# Altium PCB power_model.PcbDoc (part 1 of 2)
Units mm, origin at the board's own origin, x right, y up, seen from the top; angles counter-clockwise.
Board outline 133.22 x 76.2 mm, 2 copper layers (Top Layer, Bottom Layer); 223 components, 133 nets, 558 pads, 66 vias.
Unrouted connection lines stored in the file: 2.
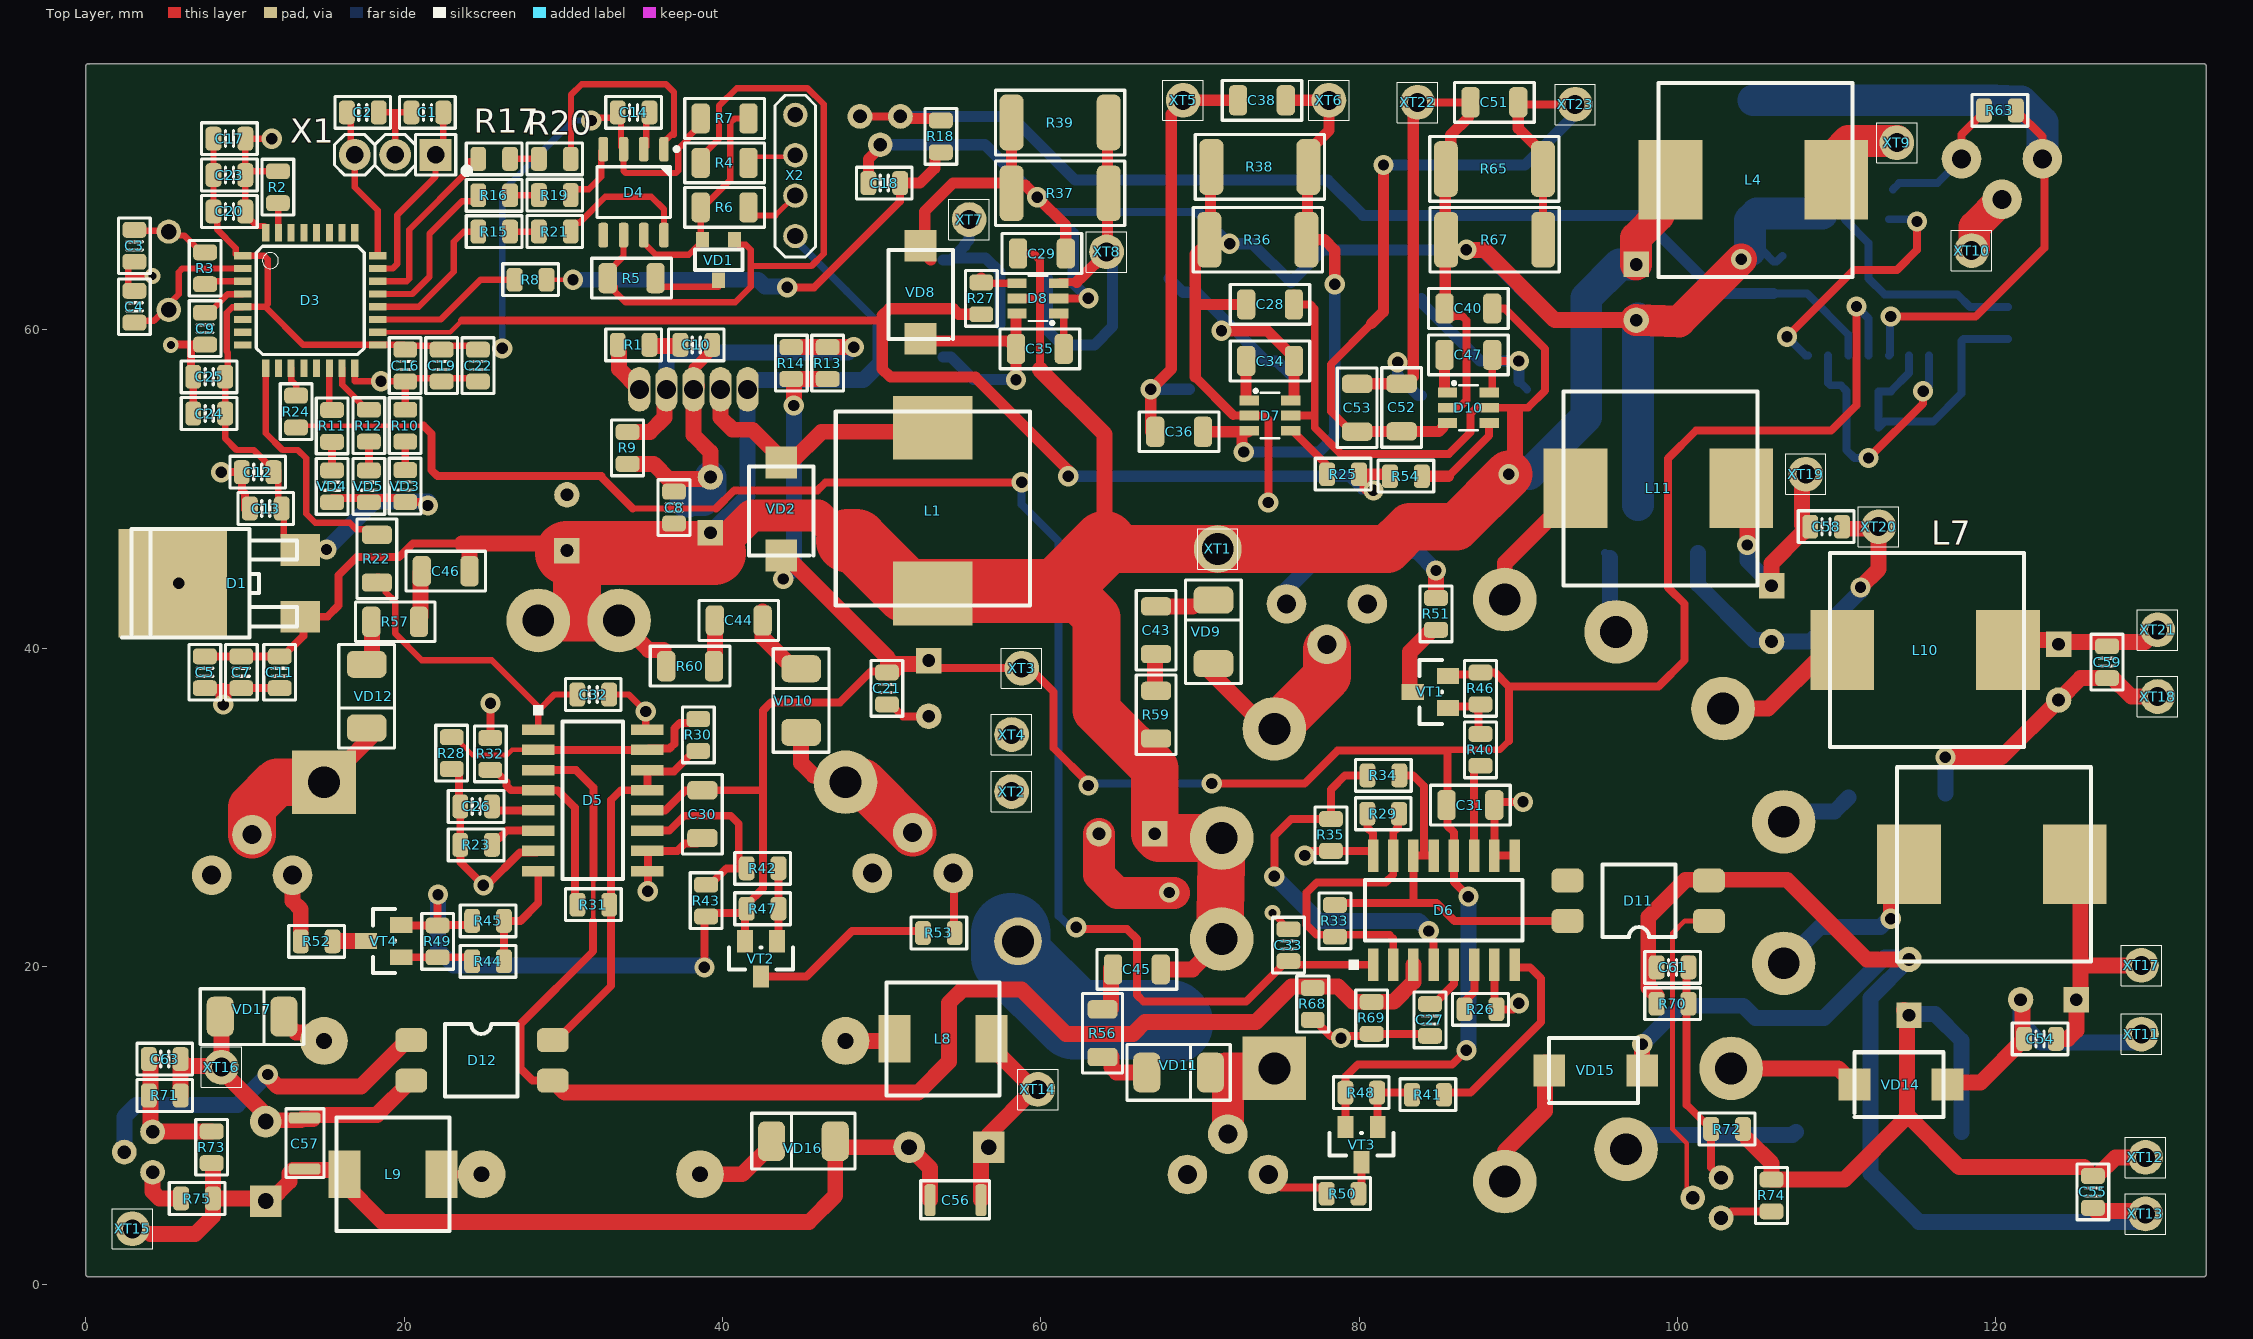
[diagram p0: Top Layer view]
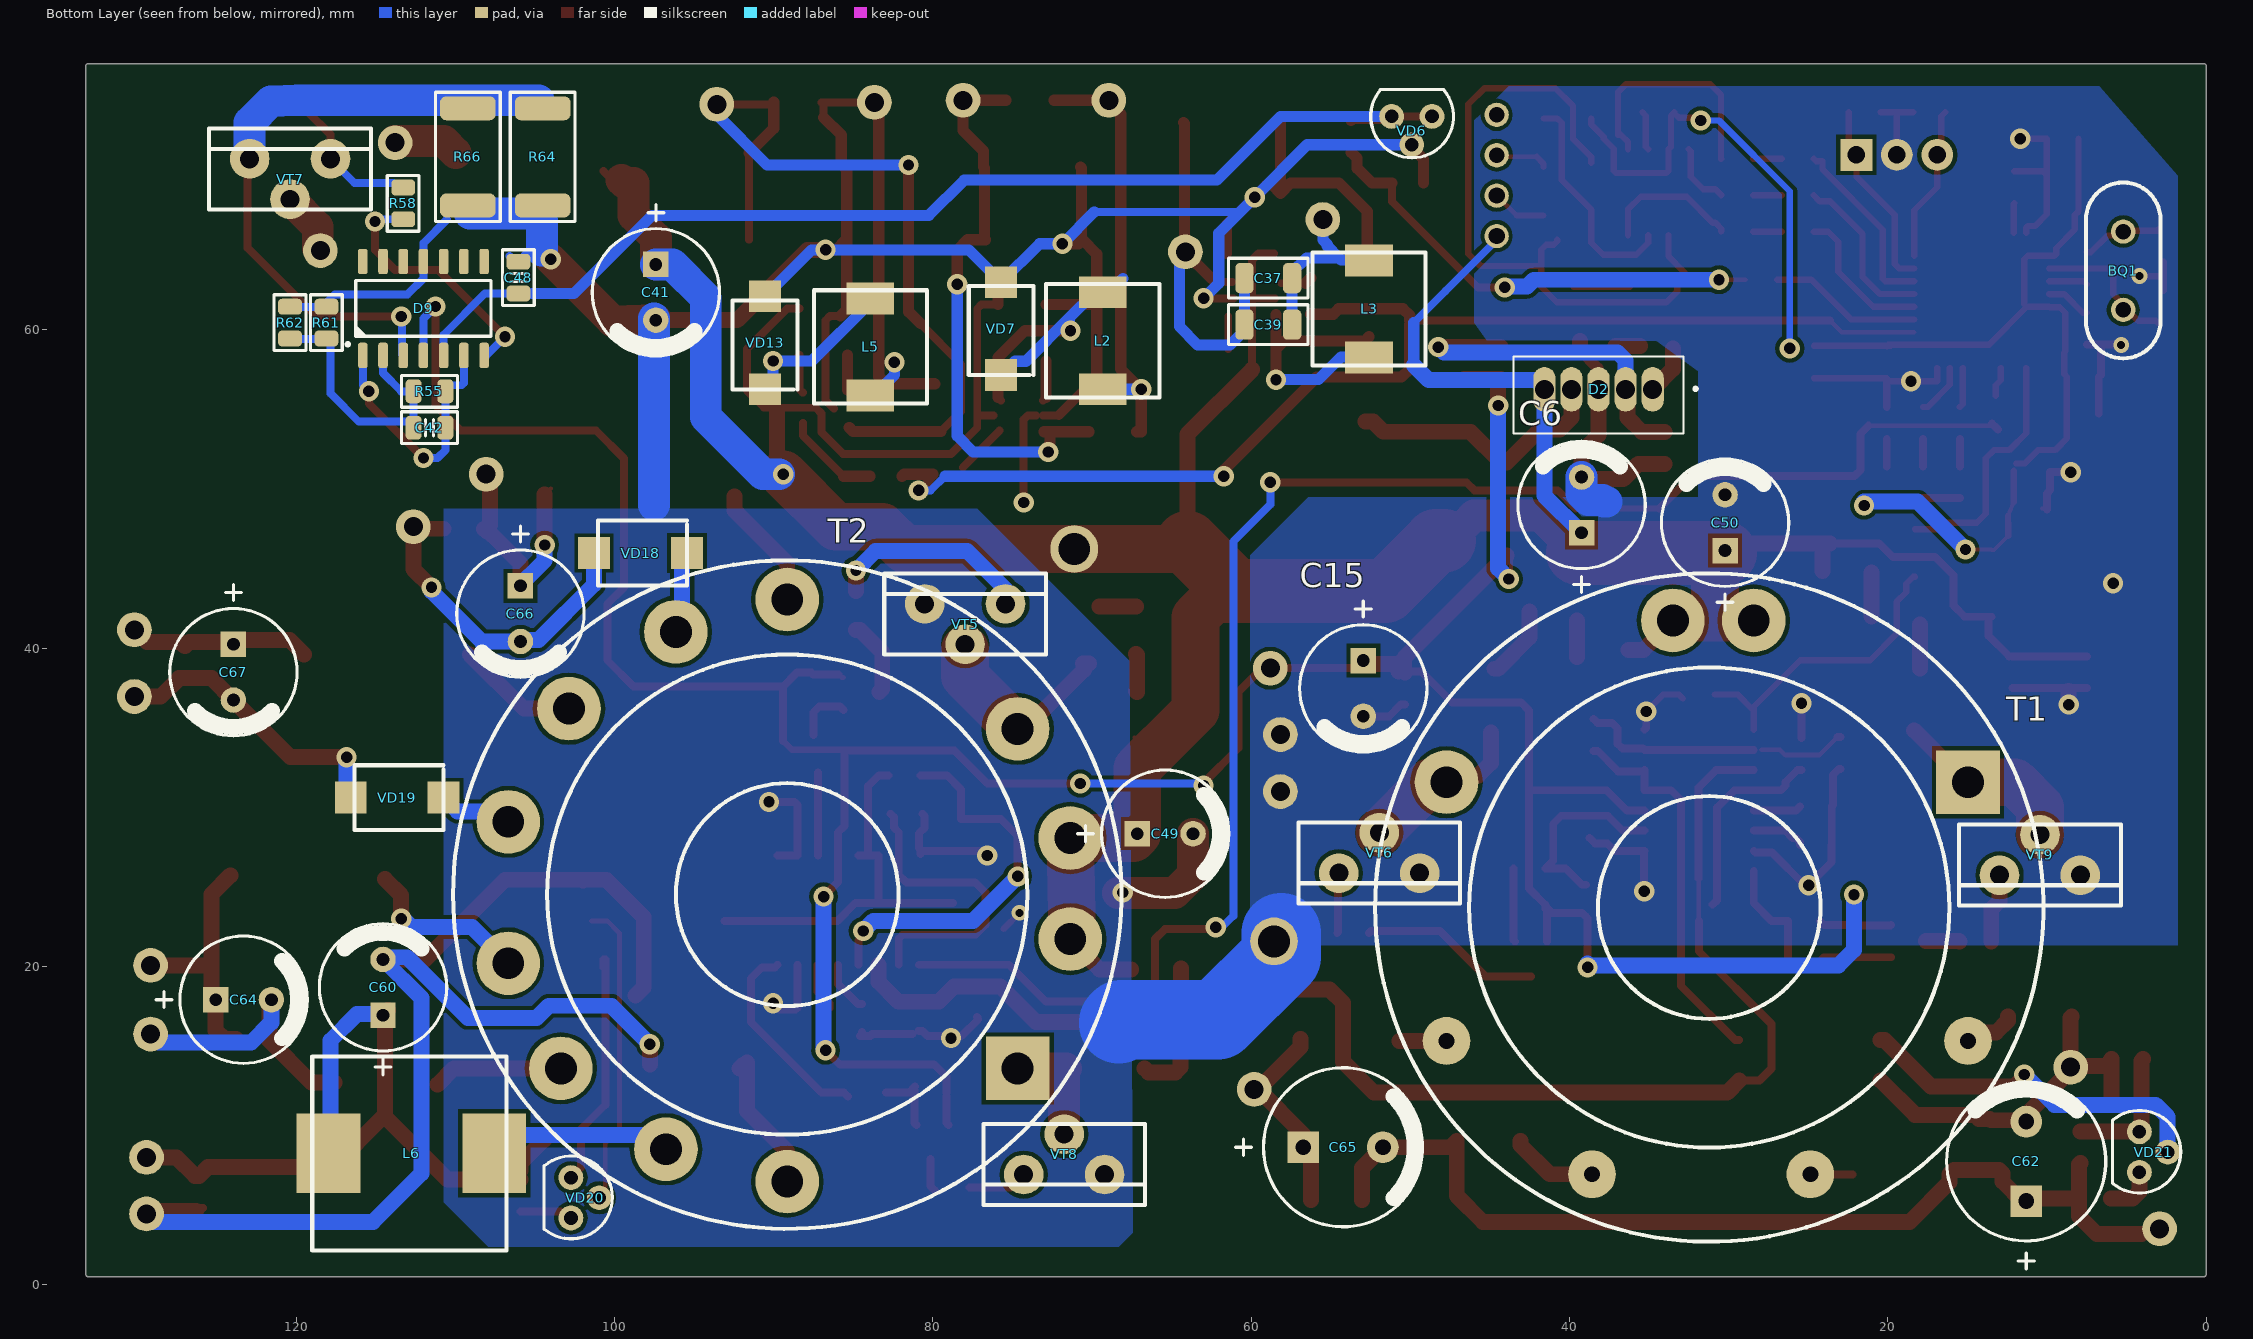
[diagram p1: Bottom Layer view, seen from below]
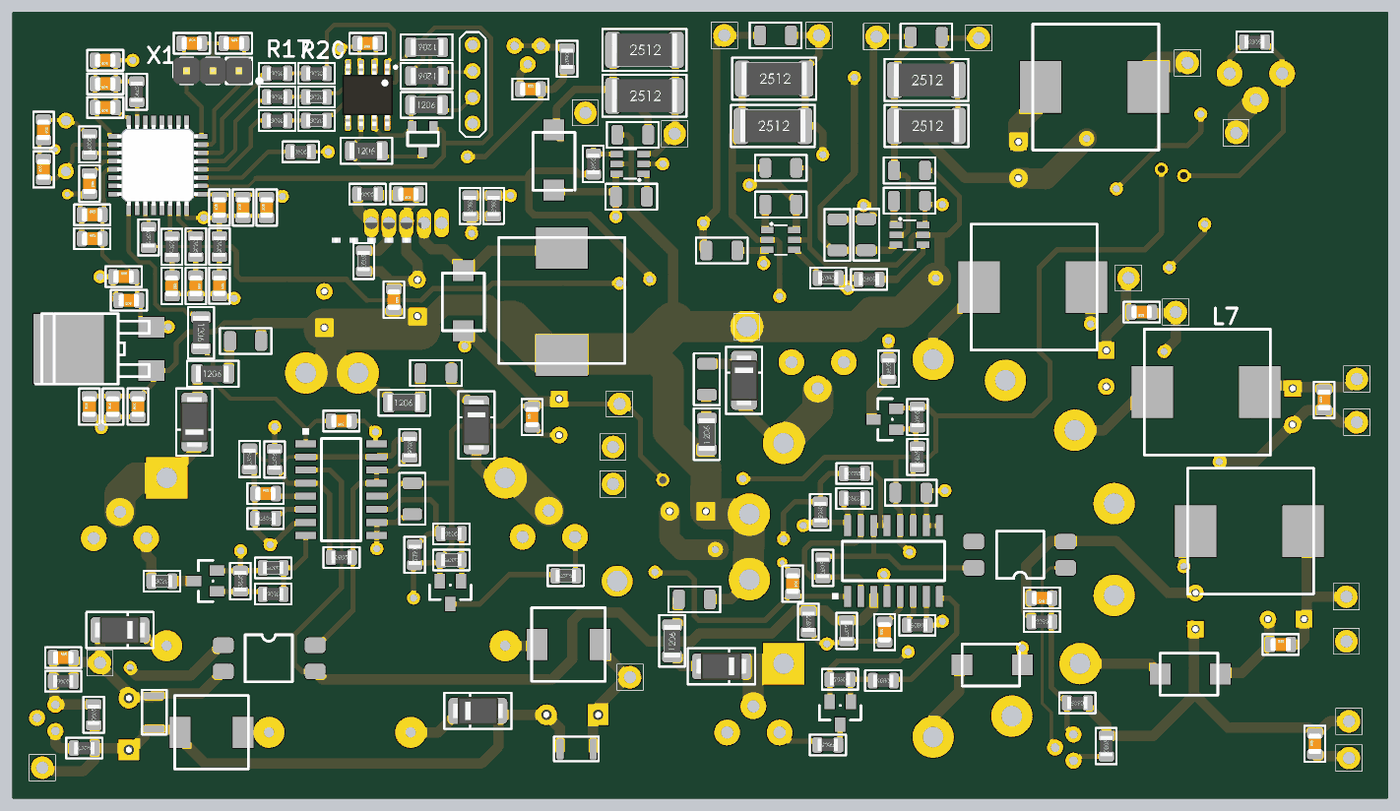
[diagram p3: 3D render of the assembled board from above, using the file's embedded part models]
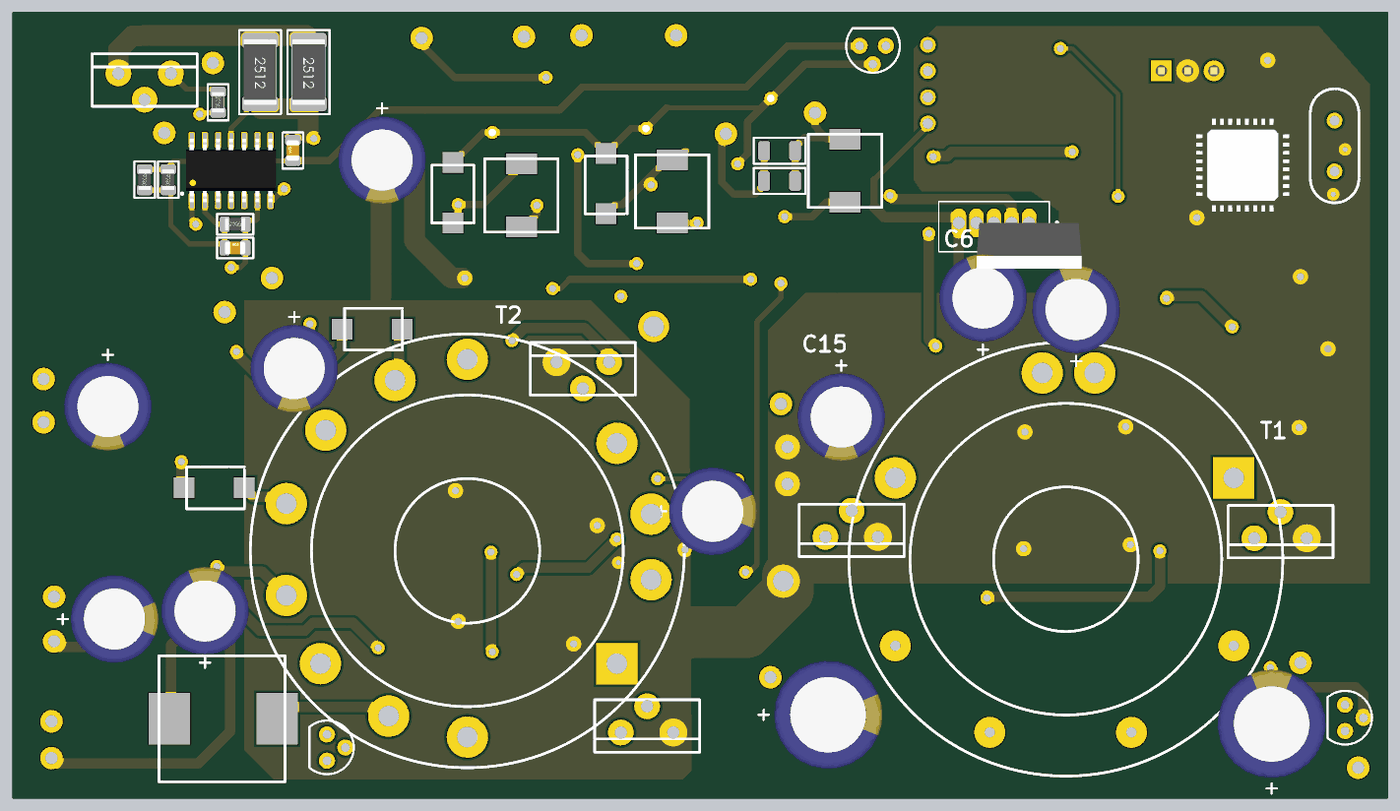
[diagram p4: 3D render of the assembled board from below, using the file's embedded part models]

## Layer stack, top to bottom
Top Solder: solder mask 0.0102, Solder Resist, Dk 3.5
Top Layer: signal copper 0.0356
Dielectric 1: dielectric 0.32, FR-4, Dk 4.8
Bottom Layer: signal copper 0.0356
Bottom Solder: solder mask 0.0102, Solder Resist, Dk 3.5

## Board outline
0.127,0.508 cw(c0.127,0.635) 0,0.635 0,76.581 cw(c0.127,76.581) 0.191,76.691 cw(c0.254,76.581) 0.254,76.708 133.096,76.708 cw(c133.096,76.581) 133.223,76.581 133.223,0.635 cw(c133.096,0.635) 133.096,0.508

## Design rules (kind name [scope] priority, off if disabled: settings)
Clearance [All] p1: gap=0.254 ignorepadtopadclearanceinfootprint=FALSE except(0: Arc-Hole Track-Hole SMDPad-Hole THPad-Hole Via-Hole Fill-Hole Poly-Hole Region-Hole Text-Hole)
PlaneClearance [All] p1: clearance=0.5
PolygonConnect [All] p1: connectstyle=Direct reliefconductorwidth=0.254 reliefentries=4 polygonreliefangle="90 Angle" airgapwidth=0.254
RoutingVias [All] p1: holewidth=0.711 width=1.27 viastyle="Through Hole" minholewidth=0.711 minwidth=1.27 maxholewidth=0.711 maxwidth=1.27
SolderMaskExpansion [All] p1: expansion=0.102
Width [All] p1: maxlimit=0.254 minlimit=0.254 preferedwidth=0.254
29 further rules are at their usual default settings.

## Classes and differential pairs
component class power_module: BQ1 C1 C2 C4 C6 C10 C11 C14 C15 C18 C19 C20 C21 C25 C27 C28 C31 C32 C33 C34 C42 C43 C44 C45 C46 C48 C51 C53 C54 C56 C58 C60 C61 C62 C63 C64 D1 D2 D3 D4 D5 D6 D7 D8 D9 D10 D11 D12 L1 L2 L3 L5 L7 L9 L11 R1 R3 R5 R6 R8 R9 R11 R14 R15 R17 R19 R21 R23 R24 R25 R26 R31 R34 R36 R39 R40 R45 R46 R48 R49 R53 R56 R58 R60 R61 R64 R66 R67 R69 R72 R74 T1 T2 VD1 VD5 VD6 VD7 VD8 VD9 VD10 VD11 VD12 VD13 VD14 VD15 VD16 VD17 VD18 VD19 VD20 VD21 VT1 VT2 VT3 VT4 VT5 VT6 VT7 VT8 VT9 X1 X2 XT1 XT2 XT3 XT4 XT5 XT6 XT7 XT8 XT9 XT10 XT11 XT12 XT13 XT14 XT15 XT16 XT17 XT18 XT19 XT21 XT22 XT23

## Components (designator, comment, footprint, x,y, rotation, side; value= is the part's Value field where it differs from the comment)
BQ1 "HC-49S" HC-49S 5.207,66.167 r270 bottom value={Value}
C1 "CC0805" CAP-0805 21.463,73.66 r0 top
C2 "CC0805" CAP-0805 17.399,73.66 r0 top value=100p
C3 "CC0805" CAP-0805 3.048,65.278 r270 top value="27 п"
C4 "CC0805" CAP-0805 3.048,61.449 r90 top value="27 п"
C5 "CAPH" CAP-0805 7.477,38.481 r90 top value="1 мк"
C6 "C-RAD-3,5X8" CAP-D8C3.5H12 39.243,48.994 r90 bottom value="1000 мкФ"
C7 "CAPH" CAP-0805 9.763,38.481 r90 top value="1 мк"
C8 "CC0805" CAP-0805 36.957,48.831 r270 top value=105
C9 "CC0805" CAP-0805 7.493,60.071 r270 top value=100н
C10 "CC0805" CAP-0805 38.354,59.055 r180 top value=330
C11 "CAPH" CAP-0805 12.176,38.481 r90 top value="1 мк"
C12 "CAPH" CAP-0805 10.795,51.054 r0 top value="1 мк"
C13 "CAPH" CAP-0805 11.303,48.768 r180 top value="1 мк"
C14 "CC0805" CAP-0805 34.417,73.66 r180 top value=GRM21BR71H104KA01
C15 "C-RAD-3,5X8" CAP-D8C3.5H12 52.959,37.465 r270 bottom value="470 мкФ"
C16 "CC0805" CAP-0805 20.066,57.756 r90 top value=100н
C17 "CC0805" CAP-0805 9.017,72.009 r180 top value=100н
C18 "CC0805" CAP-0805 50.165,69.215 r0 top value=105
C19 "CC0805" CAP-0805 22.352,57.756 r90 top value=100н
C20 "CC0805" CAP-0805 9.017,67.437 r180 top value=100н
C21 "CC0805" CAP-0805 50.332,37.465 r90 top value=105
C22 "CC0805" CAP-0805 24.638,57.756 r90 top value=4,7мк
C23 "CC0805" CAP-0805 9.017,69.723 r180 top value=4,7мк
C24 "CC0805" CAP-0805 7.747,54.737 r0 top value=10н
C25 "CC0805" CAP-0805 7.747,57.048 r0 top value="1 мк"
C26 "CC0805" CAP-0805 24.522,30.051 r0 top value=103
C27 "CC0805" CAP-0805 84.455,16.637 r90 top value=103
C28 "CC0805" CAP-1206 74.406,61.595 r180 top value=105
C29 "CC0805" CAP-1206 60.071,64.794 r0 top value=105
C30 "C-RAD-3,5X8" CAP-1206 38.735,29.567 r270 top value="1000 мкФ"
C31 "C-RAD-3,5X8" CAP-1206 86.995,30.136 r0 top value="1000 мкФ"
C32 "CC0805" CAP-0805 31.877,37.084 r180 top value=1н
C33 "CC0805" CAP-0805 75.565,21.336 r270 top value=1н
C34 "CC0805" CAP-1206 74.406,58.039 r180 top value=105
C35 "CC0805" CAP-1206 59.944,58.801 r0 top value=105
C36 "CC0805" CAP-1206 68.691,53.594 r0 top value=105
C37 "CC0805" CAP-1206 58.928,63.246 r0 bottom value=105
C38 "CC0805" CAP-1206 73.898,74.422 r0 top value=105
C39 "CC0805" CAP-1206 58.928,60.325 r0 bottom value=105
C40 "CC0805" CAP-1206 86.868,61.341 r180 top value=105
C41 "C-RAD-3,5X8" CAP-D8C3.5H12 97.409,62.357 r270 bottom value="2200 мкФ"
C42 "CC0805" CAP-0805 111.633,53.848 r180 bottom value=103
C43 "CC0805" CAP-1206 67.246,41.124 r90 top value=105
C44 "CC0805" CAP-1206 41.021,41.735 r0 top value=105
C45 "CC0805" CAP-1206 66.04,19.812 r0 top value=105
C46 "CC0805" CAP-1206 22.606,44.831 r0 top value=105
C47 "CC0805" CAP-1206 86.868,58.42 r180 top value=105
C48 "CC0805" CAP-0805 106.045,63.278 r90 bottom value=103
C49 "C-RAD-3,5X8" CAP-D8C3.5H12 65.405,28.337 r180 bottom value="1000 мкФ"
C50 "C-RAD-3,5X8" CAP-D8C3.5H12 30.226,47.879 r90 bottom value="1000 мкФ"
C51 "CC0805" CAP-1206 88.503,74.295 r0 top value=105
C52 "CC0805" CAP-1206 82.677,55.118 r270 top value=105
C53 "CC0805" CAP-1206 79.883,55.102 r270 top value=105
C54 "CC0805" CAP-0805 122.793,15.446 r0 top value=105
C55 "CC0805" CAP-0805 126.111,5.826 r90 top value=105
C56 "CC0805" CAP-1808(4_5x2_0mm) 54.621,5.286 r0 top value=105
C57 "CC0805" CAP-1808(4_5x2_0mm) 13.716,8.89 r270 top value=105
C58 "CC0805" CAP-0805 109.347,47.625 r180 top value=105
C59 "CC0805" CAP-0805 127,39.116 r90 top value=105
C60 "C-RAD-3,5X8" CAP-D8C3.5H12 114.554,18.685 r90 bottom value="1000 мкФ"
C61 "CC0805" CAP-0805 99.695,19.939 r180 top value=105
C62 "C-RAD-3,5X8" CAP-D10C5H20 11.303,7.747 r90 bottom value="1000 мкФ"
C63 "CC0805" CAP-0805 4.953,14.176 r0 top value=105
C64 "C-RAD-3,5X8" CAP-D8C3.5H12 123.317,17.907 r180 bottom value="1000 мкФ"
C65 "C-RAD-3,5X8" CAP-D10C5H20 54.229,8.636 r180 bottom value="1000 мкФ"
C66 "C-RAD-3,5X8" CAP-D8C3.5H12 105.918,42.164 r270 bottom value="1000 мкФ"
C67 "C-RAD-3,5X8" CAP-D8C3.5H12 123.952,38.485 r270 bottom value="1000 мкФ"
D1 "LM78M05" DPAK(IR) 13.371,41.969 r90 top value=LM3,3V
D2 "LM2577T-ADJ/NOPB" VREG_LM2577T-ADJ/NOPB 34.778,56.261 r0 bottom
D3 "STM32F042K6T6" QFP80P900X900X160-32N 14.097,61.849 r0 top
D4 "SN65HVD230" 8-SOIC 34.417,68.652 r270 top
D5 "TL494CD" SOIC16MY 28.424,34.877 r0 top value=TL494D
D6 "TL494CD" SOIC16MY 80.877,20.103 r90 top value=TL494D
D7 "AP3211" SOT23-6A 74.406,54.61 r270 top
D8 "AP3211" SOT23-6A 59.817,61.976 r90 top
D9 "MC34074D_VCC" 14-SOIC 112.014,61.341 r90 bottom value=LMV324
D10 "AP3211" SOT23-6A 86.868,55.102 r270 top
D11 "PC817" PC123PJ 102.032,22.86 r180 top
D12 "PC817" PC123PJ 20.396,15.367 r0 top
L1 "RLH" L_HCJRH01207 53.213,48.768 r90 top value="100 мкГн 3A"
L2 "RLH" L_HCJRH0704 69.326,59.309 r270 bottom value="HCJRH0704-470MT (47 мкГн 0,88A 7mm x 7mm)"
L3 "RLH" L_HCJRH0704 52.594,61.308 r90 bottom value="HCJRH0704-470MT (47 мкГн 0,88A 7mm x 7mm)"
L4 "RLH" L_HCJRH01207 104.902,69.419 r0 top value="HCJRH1207 - 100MT (10 мкГн 5,4A 12mm x 12mm)"
L5 "RLH" L_HCJRH0704 83.931,58.928 r270 bottom value="HCJRH0704-470MT (47 мкГн 0,88A 7mm x 7mm)"
L6 "RLH" L_HCJRH01207 112.903,8.255 r0 bottom value="HCJRH1207 - 470MT 47 мкГн 2,5A 12mm x 12mm"
L7 "RLH" L_HCJRH01207 119.888,26.416 r0 top value="HCJRH1207 - 470MT 47 мкГн 2,5A 12mm x 12mm"
L8 "RLH" L_HCJRH0704 53.848,15.446 r0 top value="HCJRH1207 - 470MT 47 мкГн 2,5A 12mm x 12mm"
L9 "RLH" L_HCJRH0704 19.304,6.937 r180 top value="HCJRH1207 - 470MT 47 мкГн 2,5A 12mm x 12mm"
L10 "RLH" L_HCJRH01207 115.697,39.878 r0 top value="HCJRH1207 - 470MT 47 мкГн 2,5A 12mm x 12mm"
L11 "RLH" L_HCJRH01207 98.933,50.038 r0 top value="HCJRH1207 - 470MT 47 мкГн 2,5A 12mm x 12mm"
R1 "RC0805" RES-0805 34.417,59.055 r0 top value="2,2 K"
R2 "Resoistor 0805" RES-0805 12.065,68.961 r90 top value=0805S8J0103T5E
R3 "Resoistor 0805" RES-0805 7.493,63.865 r90 top value=0805S8J0103T5E
R4 "Resistor 1206" RES-1206 40.132,70.485 r180 top value=1206W4J0200T5E
R5 "Resistor 1206" RES-1206 34.29,63.246 r0 top value=1206W4J0200T5E
R6 "Resistor 1206" RES-1206 40.132,67.691 r0 top value=1206W4J0200T5E
R7 "Resistor 1206" RES-1206 40.132,73.279 r180 top value=1206W4J0200T5E
R8 "RC0805" RES-0805 27.94,63.146 r0 top value=1K
R9 "RC0805" RES-0805 34.036,52.578 r90 top value="2,0 K"
R10 "Resoistor 0805" RES-0805 20.066,53.975 r270 top value=0805S8J0103T5E
R11 "Resoistor 0805" RES-0805 15.47,53.959 r270 top value=0805S8J0103T5E
R12 "Resoistor 0805" RES-0805 17.78,53.975 r270 top value=0805S8J0103T5E
R13 "RC0805" RES-0805 46.609,57.912 r270 top value="17,4 K"
R14 "RC0805" RES-0805 44.323,57.912 r270 top value="100 K"
R15 "Resoistor 0805" RES-0805 25.654,66.167 r180 top value=0805S8J0103T5E
R16 "Resoistor 0805" RES-0805 25.654,68.453 r180 top value=0805S8J0103T5E
R17 "Resoistor 0805" RES-0805 25.654,70.739 r180 top value=0805S8J0103T5E
R18 "RC0805" RES-0805 53.721,72.152 r270 top value=1K
R19 "Resoistor 0805" RES-0805 29.464,68.461 r180 top value=0805S8J0101T5E
R20 "Resoistor 0805" RES-0805 29.464,70.739 r180 top value=0805S8J0101T5E
R21 "Resoistor 0805" RES-0805 29.464,66.176 r180 top value=0805S8J0101T5E
R22 "RC0805" RES-1206 18.288,45.617 r270 top value="39 К"
R23 "RC0805" RES-0805 24.522,27.638 r0 top value="12 К"
R24 "RC0805" RES-0805 13.208,54.864 r270 top value="39 К"
R25 "RC0805" RES-0805 78.994,50.927 r180 top value=1K
R26 "RC0805" RES-0805 87.63,17.303 r180 top value="12 К"
R27 "RC0805" RES-0805 56.261,61.976 r90 top value=1K
R28 "RC0805" RES-0805 22.987,33.401 r90 top value="39 К"
R29 "RC0805" RES-0805 81.518,29.591 r0 top value="39 К"
R30 "RC0805" RES-0805 38.481,34.544 r270 top value="39 К"
R31 "RC0805" RES-0805 31.885,23.876 r0 top value="10 К"
R32 "RC0805" RES-0805 25.411,33.353 r90 top value="39 К"
R33 "RC0805" RES-0805 78.486,22.86 r90 top value="39 К"
R34 "RC0805" RES-0805 81.534,32.004 r0 top value="10 К"
R35 "RC0805" RES-0805 78.232,28.257 r270 top value="39 К"
R36 "RC0805" RES-2512 73.644,65.659 r0 top value=1K
R37 "RC0805" RES-2512 61.214,68.58 r0 top value=1K
R38 "RC0805" RES-2512 73.771,70.231 r0 top value=1K
R39 "RC0805" RES-2512 61.214,73.025 r0 top value=1K
R40 "RC0805" RES-0805 87.63,33.607 r90 top value=10K
R41 "RC0805" RES-0805 84.328,11.938 r180 top value=10K
R42 "RC0805" RES-0805 42.521,26.162 r0 top value=10K
R43 "RC0805" RES-0805 38.973,24.13 r270 top value=10K
R44 "RC0805" RES-0805 25.273,20.32 r180 top value=10K
R45 "RC0805" RES-0805 25.273,22.86 r180 top value=10K
R46 "RC0805" RES-0805 87.63,37.465 r90 top value="10 К"
R47 "RC0805" RES-0805 42.521,23.622 r180 top value="10 К"
R48 "RC0805" RES-0805 80.137,12.065 r180 top value="10 К"
R49 "RC0805" RES-0805 22.098,21.574 r90 top value="10 К"
R50 "RC0805" RES-0805 78.962,5.715 r180 top value=100
R51 "RC0805" RES-0805 84.836,42.148 r90 top value=100
R52 "RC0805" RES-0805 14.502,21.574 r180 top value=100
R53 "RC0805" RES-0805 53.594,22.098 r0 top value=100
R54 "RC0805" RES-0805 82.947,50.8 r0 top value=1K
R55 "RC0805" RES-0805 111.633,56.134 r0 bottom value=100К
R56 "RC0805" RES-1206 63.881,15.803 r90 top value="10 К"
R57 "RC0805" RES-1206 19.431,41.656 r0 top value="10 К"
R58 "RC0805" RES-0805 113.284,67.945 r90 bottom value=220
R59 "RC0805" RES-1206 67.246,35.814 r90 top value="10 К"
R60 "RC0805" RES-1206 37.966,38.862 r0 top value="10 К"
R61 "RC0805" RES-0805 118.11,60.452 r90 bottom value=3,9К
R62 "RC0805" RES-0805 120.396,60.452 r90 bottom value="39 К"
R63 "RC0805" RES-0805 120.269,73.787 r0 top value=100К
R64 "RC0805" RES-2512 104.521,70.866 r270 bottom value=0,8
R65 "RC0805" RES-2512 88.503,70.104 r0 top value=1K
R66 "RC0805" RES-2512 109.22,70.866 r270 bottom value=0,8
R67 "RC0805" RES-2512 88.519,65.659 r0 top value=1K
R68 "RC0805" RES-0805 77.089,17.637 r90 top value="1 К"
R69 "RC0805" RES-0805 80.788,16.764 r90 top value="1 К"
R70 "RC0805" RES-0805 99.695,17.653 r180 top value={Value}
R71 "RC0805" RES-0805 4.953,11.89 r0 top value={Value}
R72 "RC0805" RES-0805 103.124,9.779 r180 top value={Value}
R73 "RC0805" RES-0805 7.901,8.636 r90 top value={Value}
R74 "RC0805" RES-0805 105.918,5.604 r90 top value={Value}
R75 "RC0805" RES-0805 6.985,5.413 r0 top value={Value}
T1 "TRANS_2" TRANS_R15mm_I2_II2_B 31.218,23.701 r270 bottom locked
T2 "TRANS_2" "TRANS_R15mm_I2_II4 -" 89.154,24.511 r0 bottom locked
VD1 "Diode Surface - CDSOT23-SM712" SOT-23A 40.767,65.65 r180 top value=CDSOT23-SM712
VD2 "SS310F-HF" SS320F 43.688,48.616 r270 top
VD3 "LCW LED_ORIGINAL" CAP-0805 20.066,50.181 r270 top
VD4 "LCW LED_ORIGINAL" CAP-0805 15.47,50.165 r270 top
VD5 "LCW LED_ORIGINAL" CAP-0805 17.78,50.165 r270 top
VD6 "TL431_TO93" TO92-LM_TL431_TO93(Primary) 48.641,73.406 r0 bottom value=TL431
VD7 "SS310F-HF" SS320F 75.716,59.944 r270 bottom
VD8 "SS310F-HF" SS320F 52.451,62.23 r270 top
VD9 "1N4148WS" DIODE-SMA 70.848,41.021 r90 top
VD10 "1N4148WS" DIODE-SMA 44.943,36.703 r90 top
VD11 "1N4148WS" DIODE-SMA 68.659,13.335 r0 top
VD12 "1N4148WS" DIODE-SMA 17.642,36.98 r270 top
VD13 "SS310F-HF" SS320F 90.551,59.055 r270 bottom
VD14 "1N4148WS" SS320F 113.919,12.573 r180 top
VD15 "1N4148WS" SS320F 94.742,13.462 r180 top
VD16 "SS310F-HF    100V 3A SMD Шоткі-діод" DIODE-SMA 45.085,9.017 r180 top
VD17 "SS310F-HF    100V 3A SMD Шоткі-діод" DIODE-SMA 10.441,16.843 r0 top
VD18 "1N4148WS" SS320F 98.247,45.974 r180 bottom
VD19 "1N4148WS" SS320F 113.538,30.607 r180 bottom
VD20 "TL431_TO93" TO92-LM_TL431_TO93(Primary) 102.743,6.731 r270 bottom value=TL431
VD21 "TL431_TO93" TO92-LM_TL431_TO93(Primary) 4.191,9.604 r270 bottom value=TL431
VT1 "BC847_IPC" SOT-23_IPC 85.581,36.227 r90 top value=BC857
VT2 "BC847_IPC" SOT-23_IPC 43.434,21.574 r180 top value=BC857
VT3 "BC847_IPC" SOT-23_IPC 81.173,9.906 r180 top value=BC857
VT4 "BC847_IPC" SOT-23_IPC 19.812,20.574 r90 top value=BC857
VT5 "IRF2807_VERT" TO-220 75.438,42.775 r270 bottom value=12N10
VT6 "IRF2807_VERT" TO-220 54.494,25.86 r90 bottom value=12N10
VT7 "IRF2807_VERT" TO-220 117.856,70.739 r270 bottom value=IR530
VT8 "IRF2807_VERT" TO-220 74.295,6.921 r90 bottom value=12N10
VT9 "IRF2807_VERT" TO-220 12.981,25.733 r90 bottom value=12N10
X1 "PLS-3" CON-PLS-3 19.431,70.993 r180 top
X2 "15EDGVC-3.5-04P-14-00AH" JUMPER4 44.577,65.889 r90 top
XT1 "XT" CON1,2#1 71.12,46.228 r90 top
XT2 "XT" CON1,2#2 58.166,30.988 r180 top
XT3 "XT" CON1,2#2 58.801,38.735 r90 top
XT4 "XT" CON1,2#2 58.164,34.568 r180 top
XT5 "XT" CON1,2#2 68.945,74.422 r0 top
XT6 "XT" CON1,2#2 78.105,74.422 r0 top
XT7 "XT" CON1,2#2 55.499,66.929 r0 top
XT8 "XT" CON1,2#2 64.135,64.897 r0 top
XT9 "XT" CON1,2#2 113.792,71.755 r90 top
XT10 "XT" CON1,2#2 118.491,64.979 r90 top
XT11 "XT" CON1,2#2 129.159,15.748 r90 top
XT12 "XT" CON1,2#2 129.413,8.001 r180 top
XT13 "XT" CON1,2#2 129.413,4.445 r180 top
XT14 "XT" CON1,2#2 59.817,12.271 r90 top
XT15 "XT" CON1,2#2 2.921,3.513 r90 top
XT16 "XT" CON1,2#2 8.509,13.668 r180 top
XT17 "XT" CON1,2#2 129.159,20.066 r90 top
XT18 "XT" CON1,2#2 130.175,36.957 r90 top
XT19 "XT" CON1,2#2 108.069,50.927 r180 top
XT20 "XT" CON1,2#2 112.649,47.625 r180 top
XT21 "XT" CON1,2#2 130.175,41.148 r90 top
XT22 "XT" CON1,2#2 83.677,74.295 r270 top
XT23 "XT" CON1,2#2 93.583,74.168 r270 top

## Footprints (in the part's own frame and the unit in brackets; to place one, negate y for a bottom-side part, rotate by r counter-clockwise, add the part's x,y. Pads: shape width x height; smd on the part's side, far side on the other; paste and mask are expansions set on the pad)
8-SOIC [mm] "pitch 1.27 mm"
  rrect50% 1.55x0.6 smd paste-0.1: 1(-2.7,1.905) 2(-2.7,0.635) 3(-2.7,-0.635) 4(-2.7,-1.905) 5(2.7,-1.905) 6(2.7,-0.635) 7(2.7,0.635) 8(2.7,1.905)
  silkscreen extent -2.82,-2.3 1.61,2.83, body extent -3,-2.45 3,2.45, height 1.75
14-SOIC [mm] "pitch 1.27 mm"
  rrect50% 1.6x0.6 smd paste-0.1: 1(-2.95,3.81) 2(-2.95,2.54) 3(-2.95,1.27) 4(-2.95,0) 5(-2.95,-1.27) 6(-2.95,-2.54) 7(-2.95,-3.81) 8(2.95,-3.81) 9(2.95,-2.54) 10(2.95,-1.27) 11(2.95,0) 12(2.95,1.27) 13(2.95,2.54) 14(2.95,3.81)
  silkscreen extent -2.35,-4.25 1.75,4.85, body extent -3.07,-4.34 3.07,4.36, height 1.78
CAP-0805 [mm]
  rrect50% 1x1.5 smd: 1(-1,0) 2(1,0)
  silkscreen extent -1.75,-1 1.75,1, body extent -1,-0.62 1,0.63, height 0.78
CAP-1206 [mm]
  rrect50% 1.15x1.9 smd: 1(-1.5,0) 2(1.5,0)
  silkscreen extent -2.5,-1.25 2.5,1.25, body extent -0.2,-0.2 0.05,0, height 0.25
CAP-1808(4_5x2_0mm) [mm]
  rrect50% 0.7x2 smd: 1(-1.575,0.025) 2(1.626,0.025)
  silkscreen extent -2.16,-1.14 2.16,1.24, body extent -0.51,-0.33 -0.25,-0.13, height 0.25
CAP-D8C3.5H12 [mm]
  rect 1.6x1.6 hole 0.8: 1(-1.75,0)
  round 1.6 hole 0.8: 2(1.75,0)
  silkscreen extent -5.5,-4 4,4, body extent -4.25,-4.25 4.25,4.25, height 13
CAP-D10C5H20 [mm]
  rect 2x2 hole 1: 1(-2.5,0)
  round 2 hole 1: 2(2.5,0)
  silkscreen extent -6.75,-5 5,5, body extent -5.25,-5.25 5.25,5.25, height 22.1
CON1,2#1 [mm]
  round 3 hole 2: 1(0,0)
  silkscreen extent -1.27,-1.27 1.27,1.27
CON1,2#2 [mm]
  round 2.184 hole 1.194: 1(0,0)
  silkscreen extent -1.27,-1.27 1.27,1.27
CON-PLS-3 [mm]
  rect 2x2 hole 1.1: 1(-2.54,0)
  round 2 hole 1.1: 2(0,0) 3(2.54,0)
  silkscreen extent -4.7,-1.27 3.81,1.27, body extent -3.81,-1.27 3.81,1.27, height 8.54
DIODE-SMA [mm]
  rrect50% 1.7x2.5 smd: 1(-2,0) 2(2,0)
  round 0.5 on Mech4: ""(2,0.9)
  silkscreen extent -3.25,-1.75 3.25,1.75, body extent -2.5,-1.35 2.5,1.35, height 2.28
DPAK(IR) [mm]
  rect 2x2.5 smd: 1(0,-0.1) 3(4.2,-0.1)
  rect 6.8x6.8 smd: 2(2.1,7.91)
  silkscreen extent -1.3,0.1 5.5,11.1
HC-49S [mil]
  round 60 hole 38: 1(-0.12,0) 2(193.44,0)
  silkscreen extent -122,-93 313,93
JUMPER4 [mil]
  round 60 hole 40: 1(0,0) 2(100,0)
  round 60 hole 38: 3(200,0) 4(300,0)
  silkscreen extent -52,-50 348,50
L_HCJRH0704 [mm] "SMD Shield Power Inductor"
  rect 2x3 smd: 1(-3.048,0) 2(3.048,0)
  silkscreen extent -3.56,-3.56 3.56,3.56
L_HCJRH01207 [mm] "SMD Shield Power Inductor"
  rect 4x5 smd: 1(-5.334,0) 2(5.08,0)
  silkscreen extent -6.1,-6.1 6.1,6.1
PC123PJ [mm]
  rrect50% 2x1.5 smd: 1(0.051,0) 2(0.051,-2.54) 3(8.941,-2.54) 4(8.941,0)
  silkscreen extent 2.16,-3.56 6.73,1.02
QFP80P900X900X160-32N [mm]
  rect 1.1x0.45 smd: 1(-4.25,2.8) 2(-4.25,2) 3(-4.25,1.2) 4(-4.25,0.4) 5(-4.25,-0.4) 6(-4.25,-1.2) 7(-4.25,-2) 8(-4.25,-2.8) 17(4.25,-2.8) 18(4.25,-2) 19(4.25,-1.2) 20(4.25,-0.4) 21(4.25,0.4) 22(4.25,1.2) 23(4.25,2) 24(4.25,2.8)
  rect 0.45x1.1 smd: 9(-2.8,-4.25) 10(-2,-4.25) 11(-1.2,-4.25) 12(-0.4,-4.25) 13(0.4,-4.25) 14(1.2,-4.25) 15(2,-4.25) 16(2.8,-4.25) 25(2.8,4.25) 26(2,4.25) 27(1.2,4.25) 28(0.4,4.25) 29(-0.4,4.25) 30(-1.2,4.25) 31(-2,4.25) 32(-2.8,4.25)
  silkscreen extent -3.4,-3.4 3.4,3.4, body extent -4.5,-4.5 4.5,4.5, height 0.72
RES-0805 [mm]
  rrect50% 1x1.5 smd: 1(-1,0) 2(1,0)
  silkscreen extent -1.75,-1 1.75,1, body extent -1,-0.6 1,0.6, height 0.44
RES-1206 [mm]
  rrect50% 1.15x1.9 smd: 1(-1.5,0) 2(1.5,0)
  silkscreen extent -2.5,-1.25 2.5,1.25, body extent -1.65,-0.8 1.55,0.8, height 0.47
RES-2512 [mm]
  rrect50% 1.5x3.5 smd: 1(-3.05,0) 2(3.05,0)
  silkscreen extent -4.06,-2.03 4.06,2.03, body extent -3.17,-1.6 3.17,1.6, height 0.52
SOIC16MY [mil]
  rect 80x26 smd: 1(0,0) 2(0,-50) 3(0,-100) 4(0,-150) 5(0,-200) 6(0,-250) 7(0,-300) 8(0,-350) 9(270,-350) 10(270,-300) 11(270,-250) 12(270,-200) 13(270,-150) 14(270,-100) 15(270,-50) 16(270,0)
  silkscreen extent -12,-370 210,60
SOT23-6A [mm]
  rect 0.62x1.22 smd: 1(-0.95,-1.31) 2(0,-1.31) 3(0.95,-1.31) 4(0.95,1.31) 5(0,1.31) 6(-0.95,1.31)
  silkscreen extent -1.65,-1 1.42,0.58
SOT-23_IPC [mm]
  rect 1x1.4 smd: 1(0,0) 2(2.032,0) 3(1.016,2.21)
  silkscreen extent -0.99,0.38 3.02,1.78
SOT-23A [mil]
  rect 32x38 smd: 1(0,0) 2(80,0) 3(40,100)
  silkscreen extent -19,24 98,75
SS320F [mm] "Schottky diod"
  rect 2x2 smd: 1(-3.048,0) 2(2.794,0)
  silkscreen extent -2.79,-2.03 2.79,2.03
TO92-LM_TL431_TO93(Primary) [mil]
  round 61.2 hole 33.6: 1(0,0) 2(50,70) 3(100,0)
  silkscreen extent -53,-67 151,102
TO-220 [mil]
  round 98 hole 47: 1(0,0) 2(100,-100) 3(0,-200)
  silkscreen extent -75,-300 125,100
TRANS_R15mm_I2_II2_B [mm]
  rect 4x4 hole 2: 1(-7.874,16.256)
  round 4 hole 2: 2(-18.034,2.794) 3(-18.034,-2.286) 4(-7.874,-16.51)
  round 3 hole 1: 5(8.382,-16.51) 6(16.764,-7.366) 7(16.764,6.35) 8(8.382,16.256)
  silkscreen extent -21,-21 21,21
"TRANS_R15mm_I2_II4 -" [mm]
  rect 4x4 hole 2: 1(-14.478,10.922)
  round 4 hole 2: 2(-17.78,2.794) 3(-17.78,-3.556) 4(-14.478,-10.414) 5(0,-18.542) 6(7,-16.51) 7(13.716,-11.684) 8(17.526,-4.572) 9(17.526,4.318) 10(14.224,10.922) 11(7.62,16.002) 12(0,18.034)
  silkscreen extent -21,-21 21,21
VREG_LM2577T-ADJ/NOPB [mm]
  oval 1.4x2.8 hole 1.2: 1(0,0) 2(1.7,0) 3(3.4,0) 4(5.1,0) 5(6.8,0)
  silkscreen extent -2.8,-2.07 8.74,2.77, body extent -5.08,0 5.08,4.44, height 16.84

## Part data
C14: "GRM21BR71H104KA01"
D1: "5 Volt 3-Terminal Positive REGULATOR"
D2: "3.5-V to 40-V, 3-A low component count step-up regulator / ????????=1.23?(1+??2/??1)", Package="TO-220-5 Texas Instruments", Check_prices=https://www.snapeda.com/parts/LM2577T-ADJ/NOPB/Texas+Instruments/view-part/?ref=eda, MF="Texas Instruments", MP=LM2577T-ADJ/NOPB, SnapEDA_Link=https://www.snapeda.com/parts/LM2577T-ADJ/NOPB/Texas+Instruments/view-part/?ref=snap
D3: "ARMA® CortexA®-M0 STM32F0 Microcontroller IC 32-Bit Single-Core 48MHz 32KB (32K x 8) FLASH 32-LQFP (7x7)", Package="LQFP-32 STMicroelectronics", Availability="In Stock", Check_prices=https://www.snapeda.com/parts/STM32F042K6T6/STMicroelectronics/view-part/?ref=eda, MF=STMicroelectronics, MP=STM32F042K6T6, Price=None, Purchase-URL=https://pricing.snapeda.com/search/part/STM32F042K6T6/?ref=eda, SnapEDA_Link=https://www.snapeda.com/parts/STM32F042K6T6/STMicroelectronics/view-part/?ref=snap
D7 D8 D10: "Conv DC-DC 4.5V to 18V Synchronous Step Down Single-Out 0.81V to 15V 1.5A 6-Pin SOT-26 T/R", Package=None, Check_prices=https://www.snapeda.com/parts/AP3211/Diodes+Inc./view-part/?ref=eda, MF="Diodes Zetex", MP=AP3211, SnapEDA_Link=https://www.snapeda.com/parts/AP3211/Diodes+Inc./view-part/?ref=snap
R2 R3 R10 R11 R12 R15 R16 R17 R19 R20 R21: library part R0805MY, "Resistor 0805, 10 kOhm, 5% 0805S8J0103T5E"
R4 R5 R7: library part R1206_IPC, "Resistor 1206, 20 Ohm, 5%, 1206W4J0200T5E", ComponentLink1Description=datasheet, ComponentLink1URL=https://eu.mouser.com/datasheet/2/1365/1-3044649.pdf
R6: library part R0805MY, "Resistor 1206, 20 Ohm, 5%, 1206W4J0200T5E"
T2: library part TRANS_2_4
VD1: library part CDSOT23-SM712, "Diode Surface - CDSOT23-SM712,  / 26V, 14V Clamp 17A (8/20µs) Ipp Tvs, SOT-23-3", ComponentLink1Description="on digikey", ComponentLink1URL=https://www.digikey.si/en/products/detail/bourns-inc/CDSOT23-SM712/1630592?s=N4IgTCBcDaIMIBEDKB5AKmAzAWiQWQHYBGCAXQF8g
VD2 VD7 VD8 VD13: library part 1N4148WS, "SS310F-HF    100V 3A SMD Шоткі-діод"
VD16 VD17: library part 1N4148WS
VT5 VT6 VT7 VT8 VT9: "N-Channel Enhancement-Mode MOSFET (TMOS)"
C1: 100 p=100p
L4 L6 L7 L8 L9 L10 L11: URL=http://mail.kosmodrom.com.ua/prodlist.php?name=drosselcdrh104r

## Free pads (board coordinates)
  round 3 hole 2: 2(58.571,21.574)

## Via types
v1: diameter 1.27, hole 0.711, Top Layer to Bottom Layer, 63 vias
v2: diameter 1, hole 0.5, Top Layer to Bottom Layer, 3 vias

## Nets (pads, with @x,y where several pads share a name; then routed paths per layer and width w, separated by ;. In a path a pad name is that pad's centre, name@x,y a point inside that pad or via, vN(x,y) a via of type N, cw(c..) or ccw(c..) an arc to the next point about the centre after c; other vN are vias at no path point)
NetBQ1_1: BQ1.1 C3.1 R3.2 | length 5
  Top Layer w0.4: C3.1@3.048,66.278 3.102,66.224 5.153,66.224 BQ1.1@5.207,66.17 5.45,65.927 6.181,65.927 7.243,64.865 R3.2@7.493,64.865
NetBQ1_2: BQ1.2 C4.1 D3.2 | length 9.2
  Top Layer w0.4: C4.1@3.048,60.449 3.168,60.569 4.275,60.569 4.959,61.253 BQ1.2@5.207,61.253 5.207,61.597 5.842,62.232 5.842,63.627 6.064,63.849 D3.2@9.847,63.849
NetC1_1: C1.1 C2.2 C3.2 C4.2 C5.1 C6.2 C7.1 C8.1 C9.2 C10.1 C11.1 C12.1 C13.2 C15.2 C16.1 C17.1 C18.1 C19.1 C20.1 C21.1 C22.1 C23.1 C24.1 C25.1 C26.1 C27.1 C28.2 C29.2 C30.2 C31.2 C32.1 C33.1 C40.2 C41.2 C48.2 C49.2 C50.2 D1.2 D2.3 D3.16 D3.32 D5.7 D5.9 D5.10 D5.16 D6.7 D6.9 D6.10 D6.16 D7.2 D8.2 D9.11 D10.2 pad.2 R2.2 R9.1 R10.1 R23.1 R26.1 R28.1 R29.1 R32.2 R35.2 R36.1 R37.1 R38.1 R39.1 R61.2 R62.2 R64.2 R65.1 R66.2 R67.1 R68.1 R69.1 VD6.2 VD7.1 VD8.1 VD13.1 VT5.3 VT6.3 VT8.3 VT9.3 X1.2 XT2.1 XT4.1 | length 322.5
  Top Layer w0.254: v2(5.334,59.039) v2@5.366,59.071 ; D1.2@5.461,44.069 v1(5.842,44.069) ; C25.1@6.604,57.166 C25.1@6.747,57.023 ; C13.2@10.006,48.719 10.033,48.692 10.109,48.768 C13.2@10.303,48.768 ; C16.1@20.066,56.769 C16.1@20.066,56.961 ; C33.1@75.565,22.336 C33.1@75.565,22.352
  Top Layer w0.4: C4.2@2.667,62.449 2.667,63.364 ; C3.2@2.667,64.278 2.667,63.364 ; v2(4.191,63.373) 4.182,63.364 2.667,63.364 ; D3.32@11.297,66.099 11.297,66.424 11.199,66.522 10.744,66.522 10.017,67.249 C20.1@10.017,67.437 C23.1@10.017,69.723 ; v1(11.684,72.009) C17.1@10.017,72.009 C23.1@10.017,69.723 ; R2.2@12.065,69.961 10.255,69.961 C23.1@10.017,69.723 ; D3.16@16.897,57.599 16.897,56.769 v1(18.542,56.769) 19.874,56.769 20.066,56.961 C22.1@24.638,56.961 ; C2.2@18.399,73.66 19.431,73.66 ; X1.2@19.431,70.993 19.431,73.66 ; C1.1@20.463,73.66 19.431,73.66 ; C32.1@32.885,36.83 33.139,37.084 34.114,37.084 v1(35.178,36.02) ; v2(74.549,23.368) C33.1@75.565,22.352
  Top Layer w0.5: v2@5.366,59.071 6.604,59.071 ; C25.1@6.604,57.166 6.604,59.071 ; C24.1@6.747,54.737 C25.1@6.747,57.023 ; C5.1@7.477,37.481 8.509,37.481 ; C9.2@7.493,59.071 6.604,59.071 ; v1(8.509,51.054) C12.1@9.795,51.054 9.795,49.923 10.006,49.712 C13.2@10.006,48.719 ; 8.803,37.481 C7.1@9.763,37.481 C11.1@12.176,37.481 ; R10.1@20.066,55.152 C16.1@20.066,56.769 ; R28.1@22.987,32.401 23.077,32.401 23.441,32.037 23.441,30.132 C26.1@23.522,30.051 R23.1@23.522,27.638 23.532,27.628 23.532,26.543 v1(24.977,25.098) 25.225,25.098 27.281,27.154 28.321,27.154 D5.7@28.424,27.257 ; R32.2@25.411,34.353 25.425,34.367 v1(25.425,36.528) ; v1(35.178,36.02) 35.178,34.98 D5.16@35.282,34.877 ; v1(35.305,24.717) 35.305,27.233 D5.10@35.282,27.257 37.163,27.257 37.624,27.718 38.386,27.718 C30.2@38.735,28.067 ; C21.1@50.332,36.465 50.582,36.465 51.332,35.715 C15.2@52.959,35.715 ; XT4.1@58.164,34.568 XT4.1@58.165,34.567 ; XT2.1@58.166,30.988 XT2.1@58.166,30.988 ; D8.2@61.127,61.976 v1(62.992,61.976) ; 72.105,54.625 D7.2@73.081,54.625 ; D7.2@73.533,54.625 74.026,54.625 74.295,54.356 v1(74.295,49.149) ; v1(76.581,26.962) 76.875,27.257 R35.2@78.232,27.257 80.674,27.257 80.769,27.162 D6.16@80.769,27.069 ; R68.1@77.157,16.664 78.199,15.621 80.335,15.621 80.661,15.947 80.891,15.947 R69.1@80.899,15.955 ; R68.1@77.208,16.803 R68.1@77.234,16.829 ; R29.1@80.661,29.591 80.534,29.464 80.534,28.702 80.877,28.359 D6.16@80.877,27.432 ; R69.1@81.292,15.748 83.82,15.748 83.931,15.637 C27.1@84.455,15.637 ; C27.1@84.455,15.891 C27.1@84.455,15.637 ; C27.1@84.582,15.637 C27.1@84.455,15.637 ; C40.2@85.804,60.871 86.465,60.871 86.741,60.595 86.741,55.56 86.222,55.042 ; R67.1@86.104,65.024 v1(86.741,65.024) ; 86.868,73.345 86.868,74.041 ; D6.7@88.497,20.103 88.5,20.1 88.5,17.402 R26.1@88.503,17.399 ; R26.1@88.63,17.303 89.662,17.303 v1(90.043,17.684) ; D6.9@89.767,26.961 D6.10@88.497,26.961 D6.10@88.497,26.961 88.496,30.135 C31.2@88.495,30.136 88.696,30.337 v1(90.297,30.337)
  Top Layer w0.6: 69.707,57.023 72.105,54.625
  Top Layer w0.7: D2.3@38.227,57.595 39.354,58.722 C10.1@39.354,59.055 ; C18.1@49.165,69.215 49.165,70.736 49.911,71.482 VD6.2@49.911,71.628 ; VD8.1@52.451,64.903 VD8.1@52.578,65.03 ; VD8.1@53.086,64.389 52.705,64.77 52.705,67.422 54.498,69.215 57.529,69.215 R37.1@58.164,68.58 ; R39.1@58.164,73.025 R37.1@58.164,68.58 ; C29.2@61.571,64.794 61.571,66.539 v1(59.784,68.326) 59.022,69.088 58.672,69.088 R37.1@58.164,68.58 ; 69.707,57.023 69.707,61.589 ; R38.1@70.721,70.231 70.658,70.168 70.658,65.722 R36.1@70.594,65.659 ; v1(71.866,65.405) 70.848,65.405 R36.1@70.594,65.659 ; C28.2@72.906,61.595 72.906,61.589 69.707,61.589 ; R67.1@85.469,65.659 R67.1@86.104,65.024 ; C40.2@85.804,60.871 85.368,61.307 C40.2@85.368,61.341 85.41,61.383 85.41,70.061 R65.1@85.453,70.104 85.758,70.409 85.758,72.235 86.868,73.345 ; 69.707,61.589 69.707,64.772 R36.1@70.594,65.659
  Top Layer w1: v1(8.636,36.449) 8.636,37.314 ; R9.1@34.036,51.578 35.671,51.578 36.632,50.617 39.116,50.617 C6.2@39.243,50.744 39.243,52.322 38.178,53.387 D2.3@38.178,56.261 D2.3@38.397,56.48 ; C10.1@39.354,59.055 C10.1@39.354,59.305 ; v1(86.741,65.024) 87.884,65.024 92.301,60.607 C41.2@97.409,60.607
  Top Layer w2: C49.2@63.655,28.337 63.655,25.753 64.8,24.608 v1@68.378,24.608 ; C41.2@97.409,60.607 100.103,60.524 100.191,60.607 v1(104.013,64.429)
  Bottom Layer w0.5: 60.706,67.404 69.867,67.404 ; v1(104.013,64.429) 104.563,64.979 ; 105.344,64.979 C48.2@106.045,64.278 106.228,64.278 C48.2@106.592,64.642 ; 110.529,66.929 112.014,65.444 D9.11@112.014,64.291 112.014,63.23 113.014,62.23 117.586,62.23 118.38,61.436 R62.2@120.777,61.436
  Bottom Layer w0.7: VD6.2@49.911,71.628 56.482,71.628 v1(59.784,68.326) 60.706,67.404 62.04,66.071 62.04,62.928 v1(62.992,61.976) ; 69.867,67.404 v1(71.866,65.405) 73.303,65.405 VD7.1@75.716,62.992 77.748,65.024 v1(86.741,65.024) 87.63,65.024 VD13.1@90.551,62.103
  Bottom Layer w2: 37.669,49.199 37.824,49.199 37.924,49.298 38.816,49.298 39.243,49.725 C6.2@39.243,50.744 ; 97.536,48.985 C41.2@97.536,60.706 ; 104.563,64.979 104.563,66.86 ; 104.632,66.929 105.013,67.31 R66.2@109.093,67.31
  Bottom Layer w5: pad.2@58.122,22.098 58.122,20.618 62.103,16.637 68.177,16.637 68.326,16.488 68.326,16.383
  other v1: 78.867,15.494 68.072,24.638
NetC1_2: C1.2 D3.23 X1.1 | length 12.1
  Top Layer w0.4: D3.23@18.347,63.849 18.353,63.855 19.278,63.855 19.558,64.135 19.558,67.211 21.971,69.624 X1.1@21.971,70.993 22.463,71.485 C1.2@22.463,73.66
NetC2_1: C2.1 D3.24 X1.3 | length 9.8
  Top Layer w0.4: C2.1@16.399,73.66 16.645,73.414 16.645,71.239 X1.3@16.891,70.993 16.891,68.961 18.347,67.505 D3.24@18.347,64.649
NetC5_2: C5.2 C6.1 C7.2 C8.2 C11.2 C28.1 C29.1 C40.1 C41.1 C45.2 C46.2 C49.1 C50.1 D1.1 D2.5 D7.5 D8.5 D10.5 L1.1 L4.1 R59.1 R60.1 T1.2 T1.3 T2.2 T2.3 X2.1 XT1.1 | length 255.5
  Top Layer w0.254: C11.2@12.176,39.481 C11.2@12.376,39.481 ; D1.1@13.471,41.969 D1.1@13.662,41.778 ; 24.106,46.561 24.13,46.585 ; R59.1@67.246,34.314 R59.1@67.321,34.389
  Top Layer w0.5: C5.2@7.477,39.481 C7.2@9.763,39.481 C11.2@12.176,39.481 ; C11.2@12.376,39.481 13.662,40.767 D1.1@13.662,41.778 ; D1.1@13.471,41.969 15.172,41.969 15.875,42.672 15.875,44.577 17.018,45.72 19.685,45.72 20.55,46.585 23.622,46.585 ; D8.5@58.507,61.976 59.944,61.976 ; C29.1@58.571,64.794 59.539,64.794 59.944,64.389 59.944,61.976 ; 59.944,57.499 59.944,61.976 ; C28.1@75.906,61.595 76.94,61.595 77.216,61.319 77.216,54.794 ; D7.5@76.2,54.625 77.216,54.625 77.216,53.848 78.867,52.197 85.638,52.197 87.003,53.562 87.003,54.745 87.36,55.102 D10.5@88.178,55.102 90.603,55.102 91.694,56.193 91.694,58.801 89.154,61.341 C40.1@88.368,61.341 ; L4.1@99.822,69.088 L4.1@100.711,69.977
  Top Layer w0.7: C28.1@75.906,61.595 C28.1@75.906,62.167
  Top Layer w1: 23.622,46.585 24.13,46.585 29.869,46.585 C50.1@30.48,45.974 ; C46.2@24.106,44.831 24.106,46.561 ; T1.2@28.424,41.735 T1.2@28.599,41.91 ; C50.1@30.226,45.72 C50.1@30.226,45.974 ; T1.3@33.329,41.91 T1.3@33.504,41.735 35.361,39.878 36.306,39.878 ; C6.1@39.243,47.244 C6.1@39.74,47.244 ; 59.944,57.499 64.008,53.435 64.008,46.616 ; C45.2@67.54,19.812 69.532,19.812 T2.2@71.056,21.336 ; v1(89.408,50.927) 89.789,51.308 89.789,54.794
  Top Layer w2: 39.466,45.974 41.818,48.327 46.002,48.327 46.498,47.831 ; C41.1@97.409,64.107 97.409,65.786 98.806,67.183 98.806,69.215 99.364,69.215 L4.1@99.568,69.419
  Top Layer w3: T1.2@28.599,41.91 T1.3@33.329,41.91 ; C50.1@30.226,45.974 C50.1@30.226,46.129 ; 30.861,42.672 C50.1@30.861,45.72 ; 61.418,44.026 61.86,43.585 63.5,41.945 63.5,36.092 65.024,34.568 66.274,33.331 66.627,32.982 67.161,32.454 C49.1@67.155,28.337 67.425,28.067 T2.3@71.374,28.067 71.25,21.719 T2.2@71.247,21.59 ; 63.881,46.228 XT1.1@71.12,46.228 81.788,46.228 83.185,47.625 86.106,47.625 v1(89.408,50.927)
  Top Layer w4: C50.1@30.226,45.974 30.48,45.974 39.466,45.974 ; 47.879,46.736 48.387,46.736 51.538,43.585 61.86,43.585 ; 61.418,44.026 64.008,46.616
  Bottom Layer w0.3: X2.1@44.577,65.653 X2.1@44.577,65.889
  Bottom Layer w0.5: X2.1@44.577,65.653 47.752,62.478 ; 47.813,62.418 49.784,60.446
  Bottom Layer w0.7: 49.784,57.774 49.784,60.446
  Bottom Layer w1: C6.1@39.243,47.244 41.578,49.579 D2.5@41.578,56.261 41.578,56.305 42.107,56.834 48.844,56.834 49.784,57.774
  Bottom Layer w2: v1@89.662,50.927 90.678,50.927 94.271,54.52 94.271,62.013 96.365,64.107 C41.1@97.409,64.107
NetC9_1: C9.1 D3.4 | length 2.8
  Top Layer w0.4: C9.1@7.493,61.071 7.743,61.071 8.902,62.23 9.828,62.23 D3.4@9.847,62.249
NetC10_2: C10.2 R1.2 | length 1.5
  Top Layer w1: R1.2@35.575,58.973 C10.2@37.1,58.973
NetC12_2: C12.2 C13.1 C14.2 C16.2 C17.2 C19.2 C20.2 C22.2 C23.2 C24.2 C25.2 D1.3 D3.1 D3.5 D3.17 D4.3 R7.2 VD3.2 VD4.2 VD5.2 | length 94
  Top Layer w0.254: C13.1@12.097,49.165 12.266,48.753 C13.1@12.445,48.318 ; D1.3@12.441,47.042 13.314,46.169 D1.3@13.471,46.169 13.492,46.19 v1(15.113,46.19)
  Top Layer w0.4: C17.2@8.017,72.009 C23.2@8.017,69.723 C20.2@8.017,67.437 8.243,67.211 8.243,66.306 9.424,65.125 9.424,64.747 9.522,64.649 D3.1@9.847,64.649 11.21,64.649 11.43,64.429 11.43,61.617 11.262,61.449 ; C12.2@11.939,51.601 11.398,51.601 10.548,52.451 9.464,52.451 8.747,53.168 C24.2@8.747,54.737 C25.2@8.747,57.048 8.902,57.203 8.902,58.577 8.843,58.636 8.843,61.062 9.203,61.422 9.82,61.422 D3.5@9.847,61.449 11.262,61.449 ; C13.1@12.097,49.165 C12.2@12.097,51.146 ; D1.3@12.441,47.042 12.441,47.625 C13.1@12.445,48.318 ; C16.2@19.812,59.003 C16.2@20.024,59.003 ; C16.2@20.066,58.961 C16.2@20.024,59.003 ; C22.2@24.638,59.003 C16.2@20.024,59.003 ; v1(31.75,73.152) 31.916,73.318 33.121,73.318 33.417,73.615 C14.2@33.417,73.66 33.623,73.454 33.623,71.51 D4.3@33.782,71.352 33.782,69.999 33.931,69.85 37.062,69.85 37.211,69.999 37.211,71.374 37.846,72.009 37.846,72.118 38.632,72.904 R7.2@38.632,73.279 ; 11.262,61.449 13.662,59.049 D3.17@18.347,59.049 19.978,59.049 C16.2@20.024,59.003
  Top Layer w0.5: VD4.2@15.47,49.419 VD3.2@20.066,49.419 ; VD3.2@20.066,49.181 21.121,49.181 v1@21.59,48.712
  Bottom Layer w0.4: v1(26.162,58.833) 26.162,68.707 30.607,73.152 31.496,73.152 31.75,73.406 v1(31.75,73.152)
  Bottom Layer w1: v1(15.113,46.19) 18.122,49.199 v1@21.488,49.199
  other v1: 21.488,48.961
NetC14_1: C14.1 D4.2 | length 2.5
  Top Layer w0.4: D4.2@35.052,71.352 35.211,71.51 35.211,73.454 C14.1@35.417,73.66